# Altium PCB MD045B_PCB.PcbDoc (part 1 of 3)
Units mm, origin at the board's own origin, x right, y up, seen from the top; angles counter-clockwise.
Board outline 82.8 x 63.09 mm, 4 copper layers (Top Layer, Ground, Power, Bottom Layer), stack 1.707 mm thick; 146 components, 68 nets, 333 pads, 309 vias.
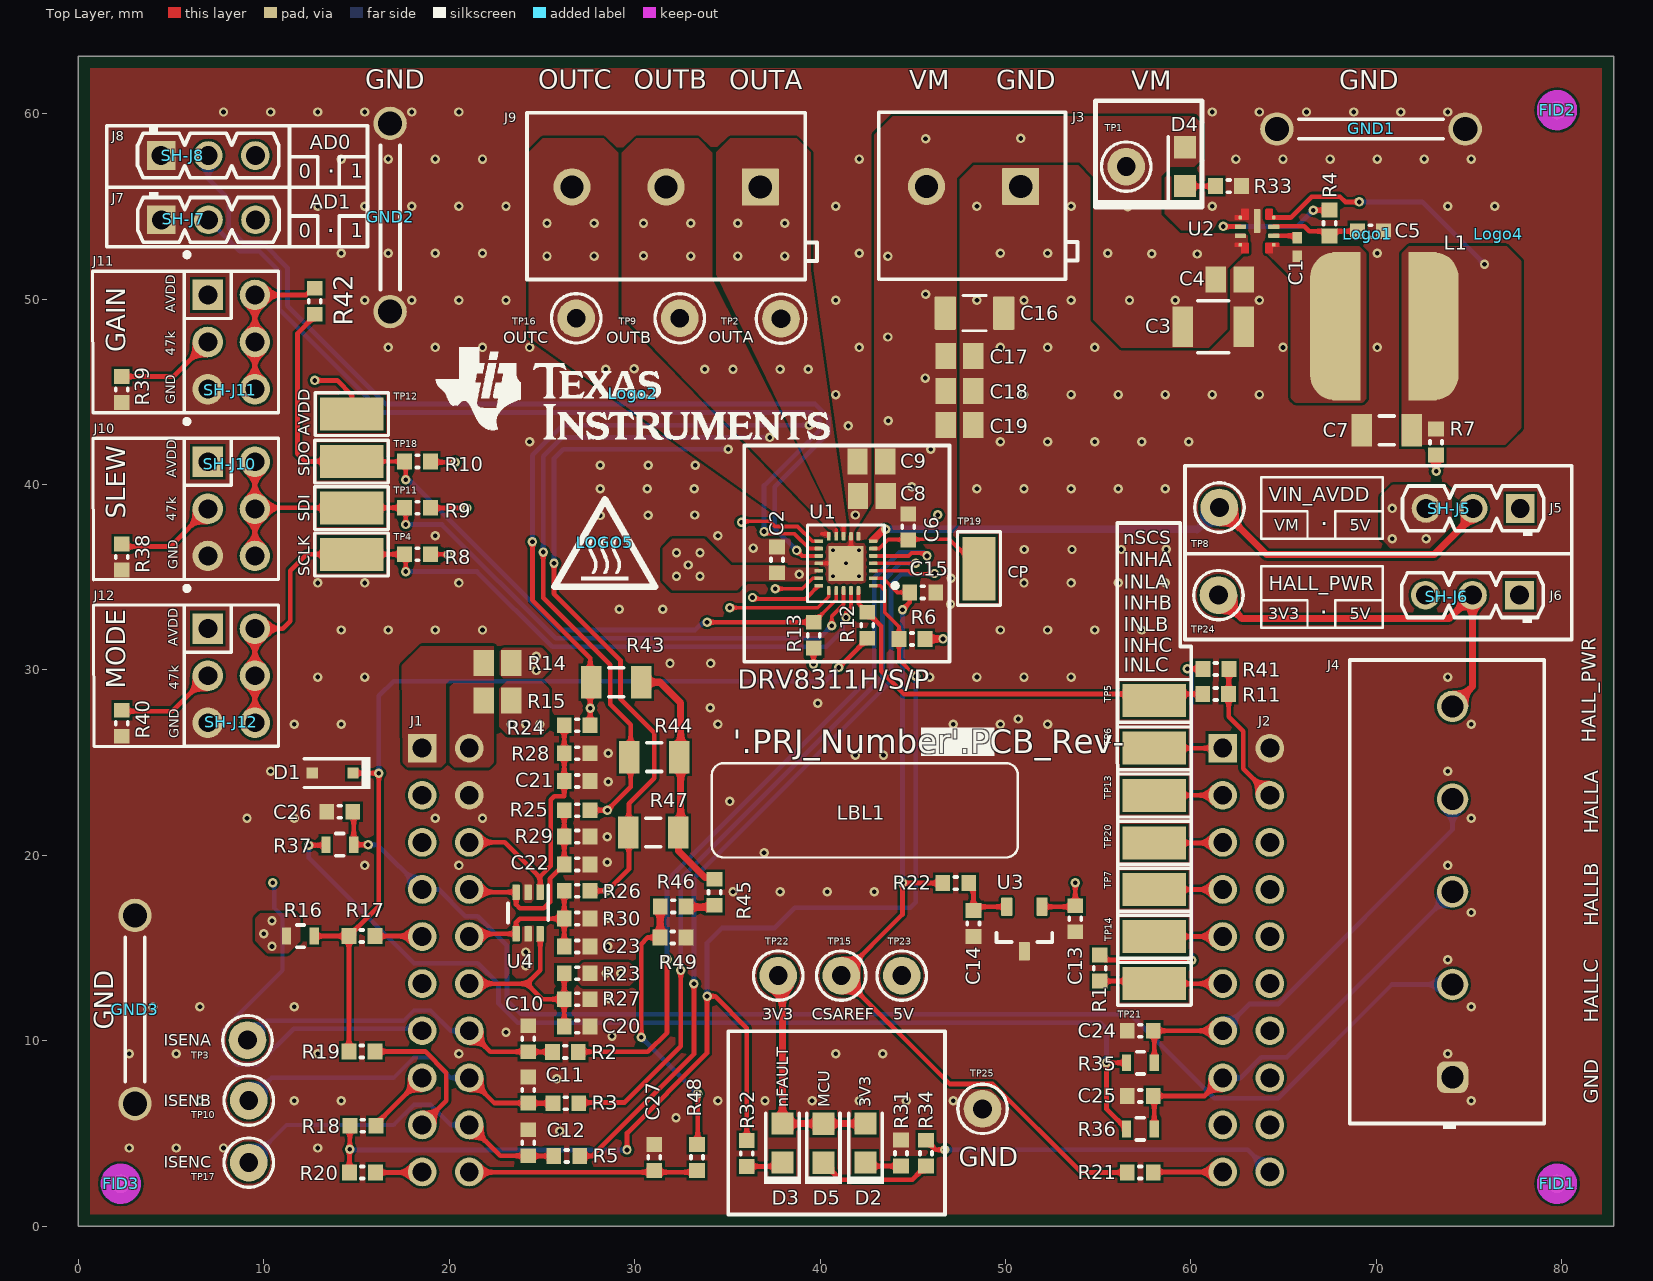
[diagram p0: Top Layer view]
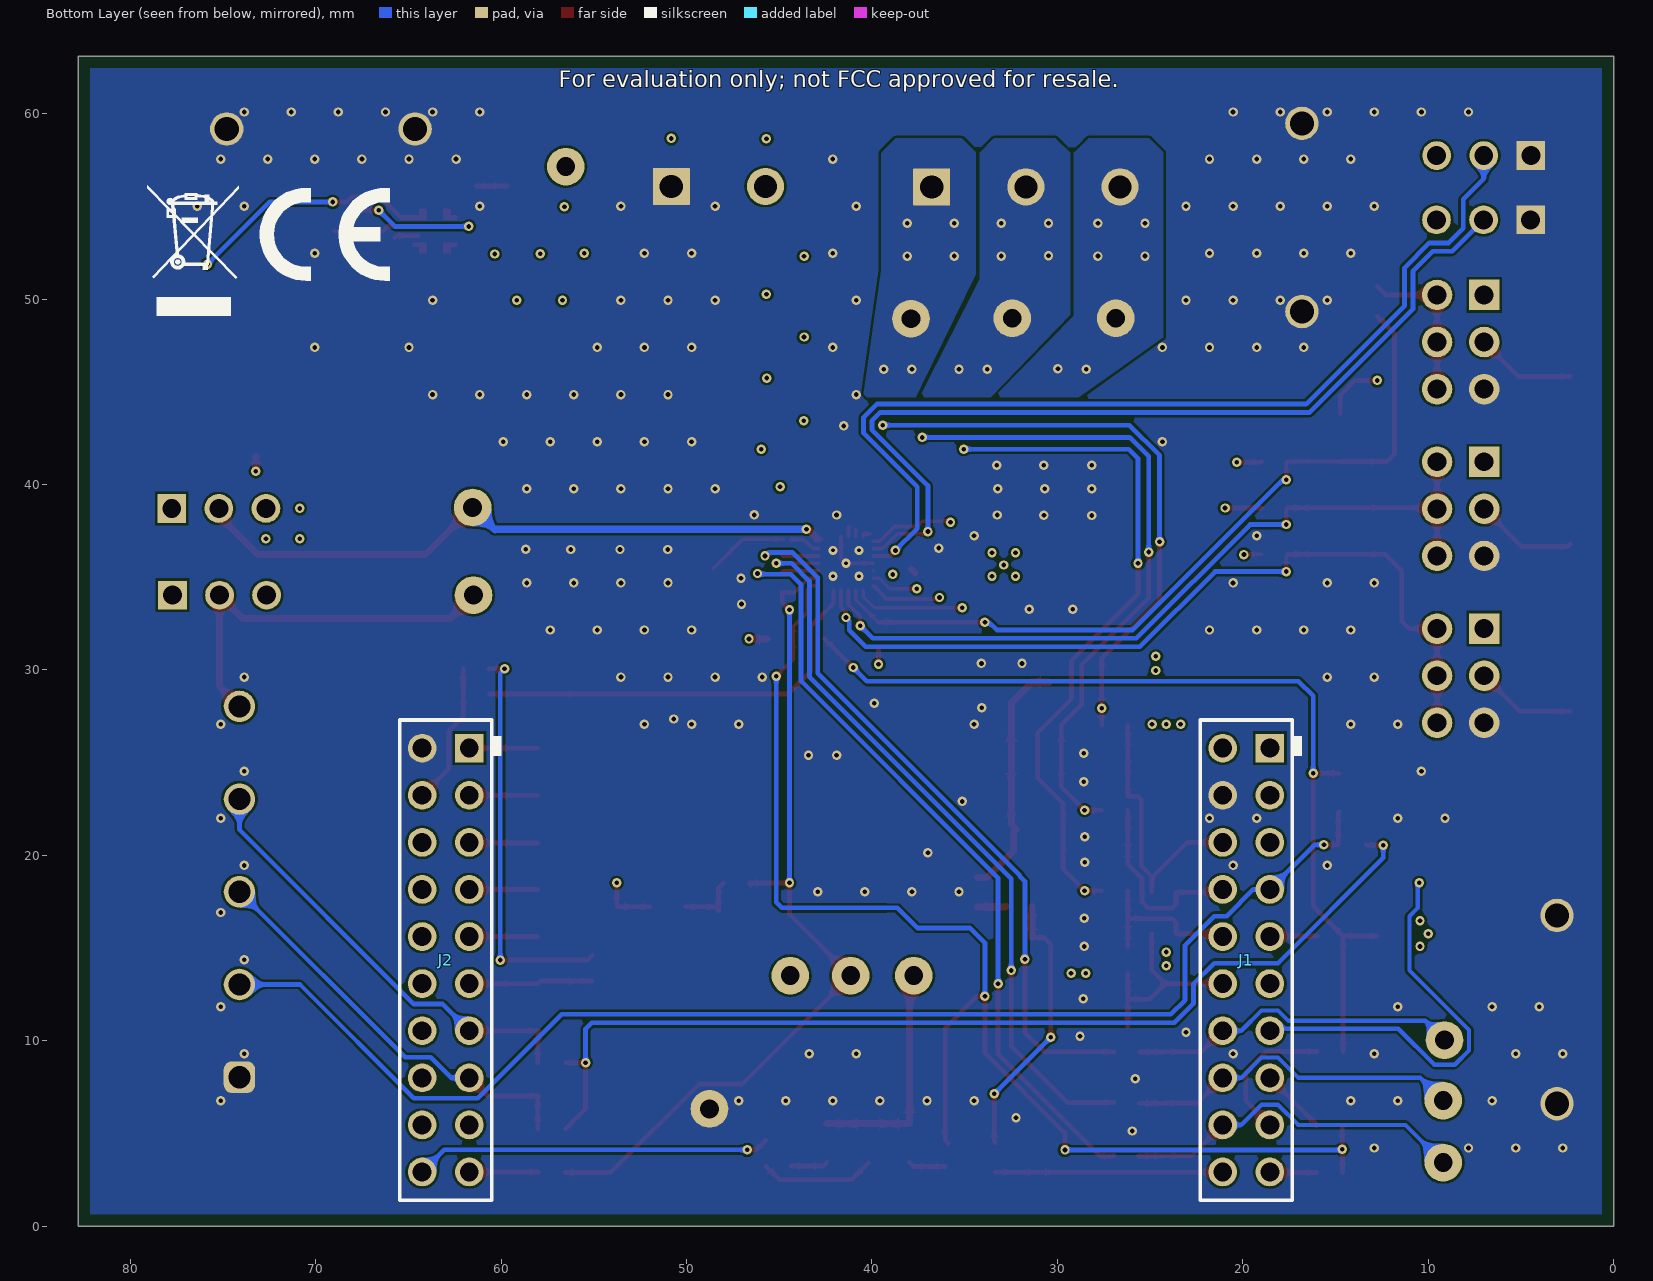
[diagram p1: Bottom Layer view, seen from below]
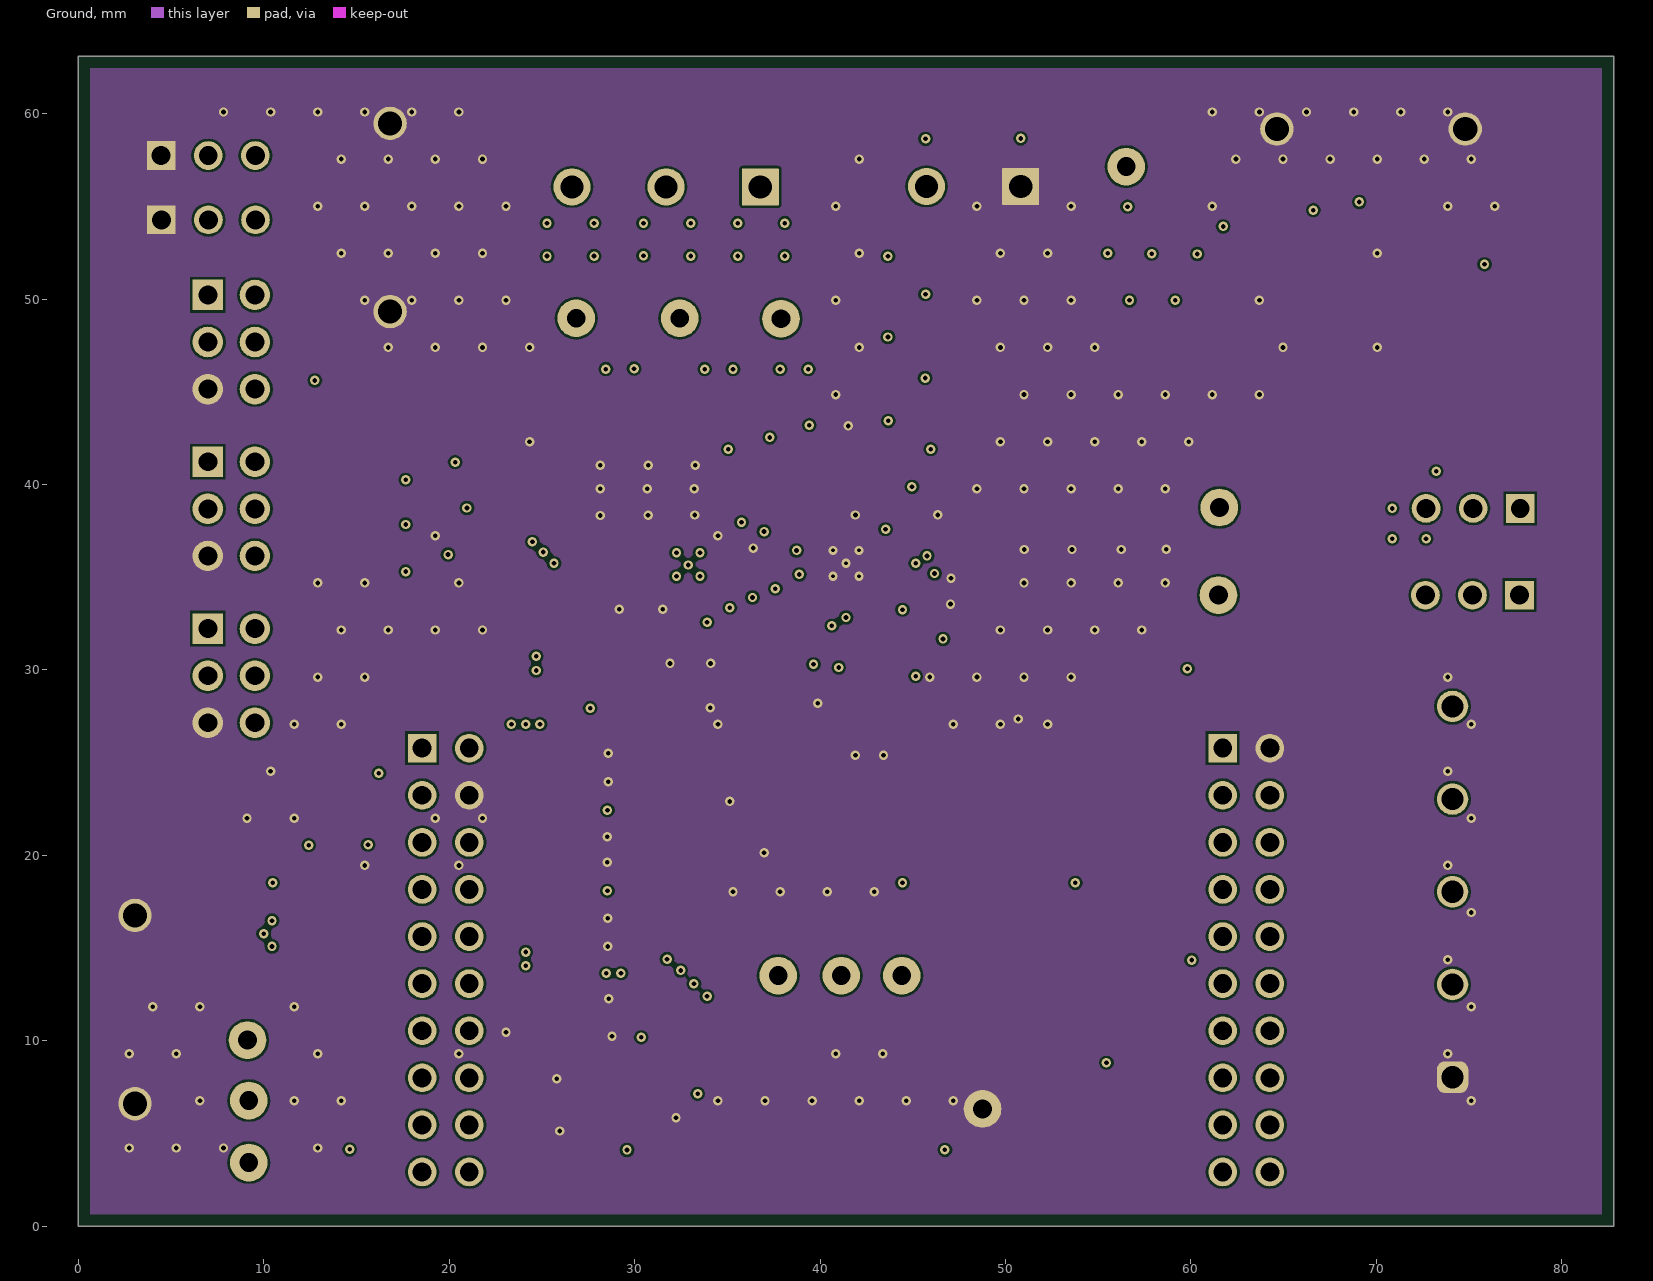
[diagram p2: Ground]
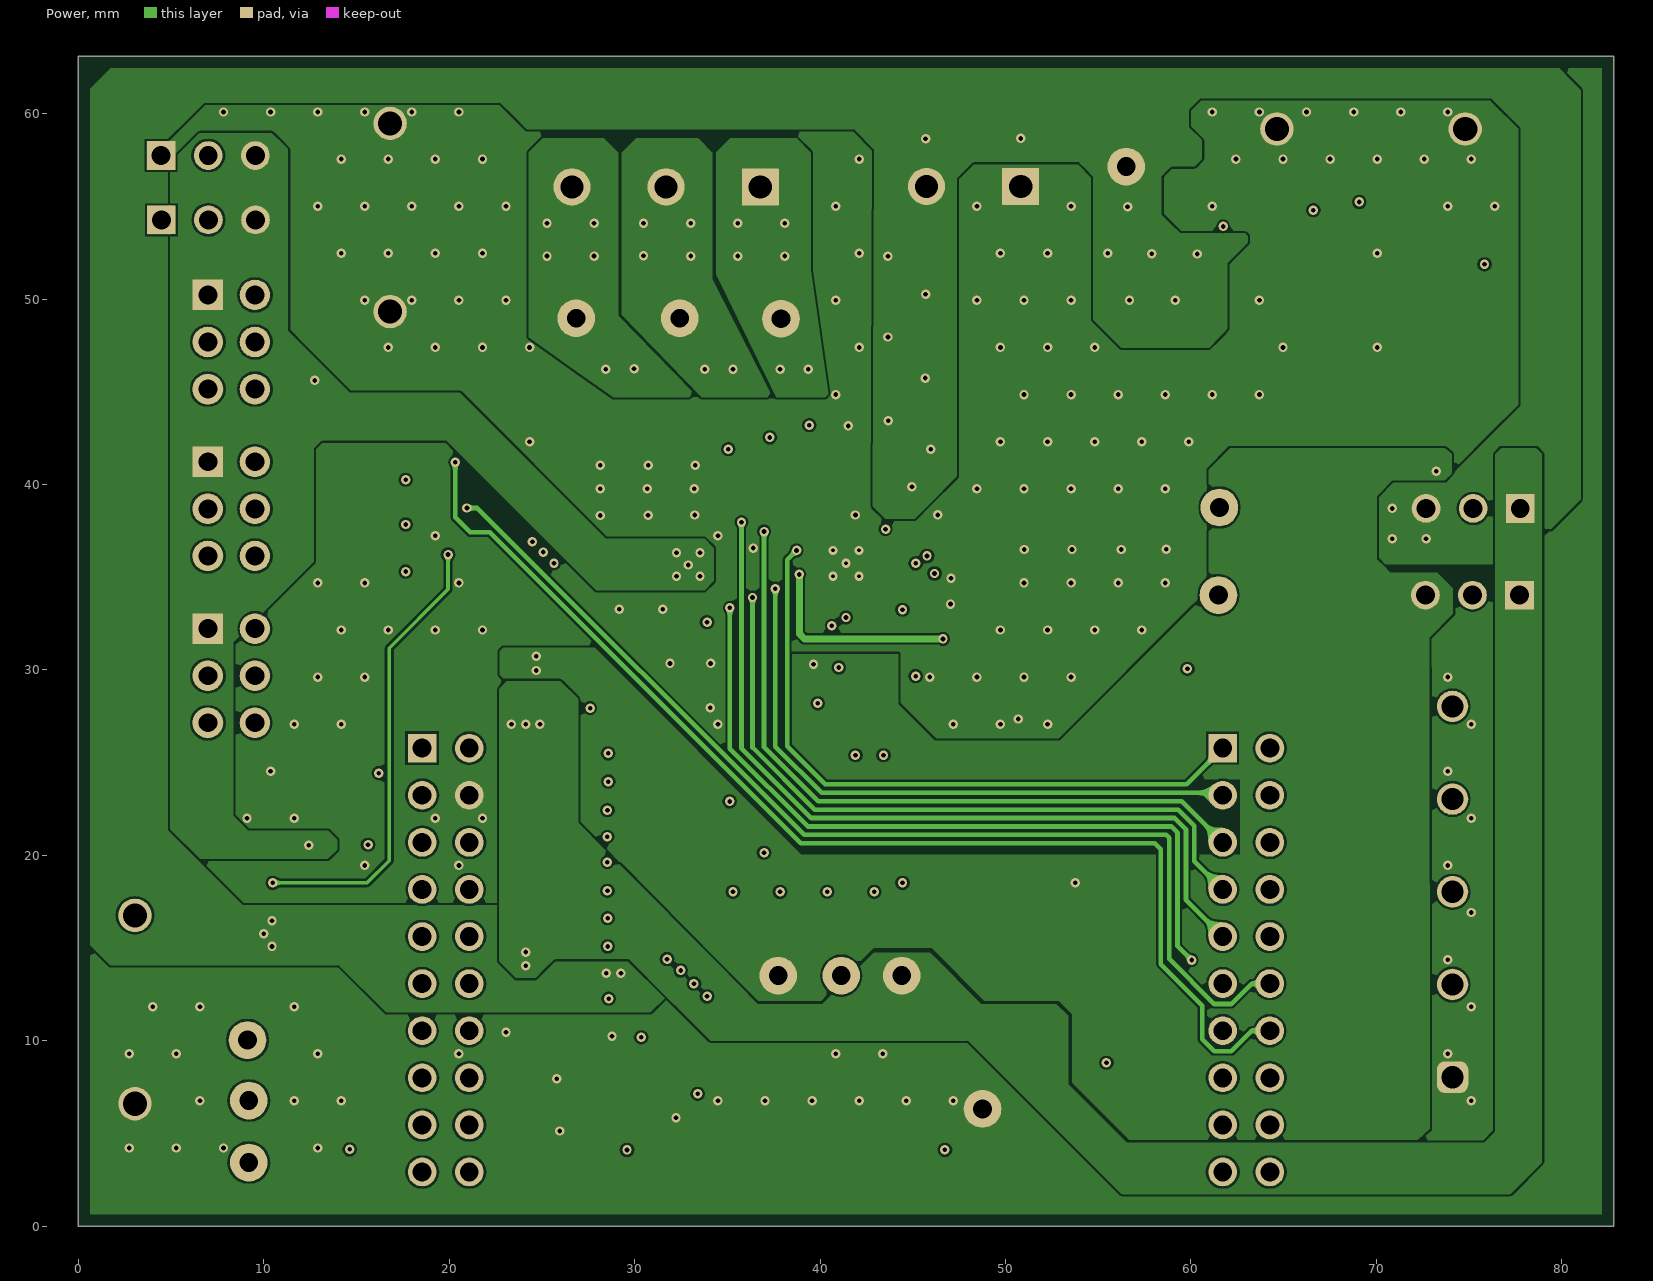
[diagram p3: Power]

## Layer stack, top to bottom
Top Solder: solder mask 0.0102, Solder Resist, Dk 3.5
Top Layer: signal copper 0.1067
Dielectric1: prepreg 0.2032, FR-4, Dk 4.2
Ground: signal copper 0.0356
Dielectric 2: core 1.016, FR-4, Dk 4.2
Power: signal copper 0.0356
Dielectric 3: prepreg 0.2032, FR-4, Dk 4.2
Bottom Layer: signal copper 0.1067
Bottom Solder: solder mask 0.0102, Solder Resist, Dk 3.5

## Board outline
0,0 82.804,0 82.804,63.094 0,63.094

## Design rules (kind name [scope] priority, off if disabled: settings)
AcuteAngle [All] p1: minimum=4.50000000000000E+0001 checktracksonly=FALSE
AssemblyTestPointUsage [All] p1: valid=2
BoardOutlineClearance BoardOutlineClearance_MountingHoles [OnCopper and InComponentClass('Mounting Holes')] p1: gap=1 ignorepadtopadclearanceinfootprint=FALSE
BoardOutlineClearance BoardOutlineClearance_Poly [OnCopper and IsPoly] p2: gap=0.635 ignorepadtopadclearanceinfootprint=FALSE
BoardOutlineClearance [OnCopper and Not InComponentClass('Logo') and not InComponentClass('FiducialMark') and not InRegion(1000,500,4000,800) and not InPoly] p3: gap=1.905 ignorepadtopadclearanceinfootprint=FALSE
Clearance Clearance_Keepouts [((IsTrack Or IsArc) And Not InPoly) And IsFree and IsKeepOut vs ((IsTrack Or IsArc) And Not InPoly) And IsFree and IsKeepOut] p1: gap=0 ignorepadtopadclearanceinfootprint=FALSE
Clearance Clearance_Poly [InPolygon] p2: gap=0.127 ignorepadtopadclearanceinfootprint=TRUE
Clearance Clearance_FiducialMark [IsKeepOut and InComponentClass('FiducialMark') vs IsPad and InComponentClass('FiducialMark')] p3: gap=0 ignorepadtopadclearanceinfootprint=FALSE
Clearance [All] p4: gap=0.2 ignorepadtopadclearanceinfootprint=TRUE
ComponentClearance ComponentClearance_MountingHoles_FiducialMarks [InComponentClass('Mounting Holes') vs InComponentClass('FiducialMark')] p1: gap=1.27 collisioncheckmode=3 verticalgap=0.254 showdistances=FALSE
ComponentClearance ComponentClearance_Shunt [InComponentClass('Header') vs InComponentClass('Shunt')] p2: gap=0 collisioncheckmode=3 verticalgap=0 showdistances=FALSE
ComponentClearance ComponentClearance_Logo [InComponentClass('Logo')] p3: gap=1.27 collisioncheckmode=3 verticalgap=0.254 showdistances=FALSE
ComponentClearance ComponentClearance_ScrewToNut [(HasFootprint('NY PMS 440 0025 PH')) vs (HasFootprint('Keystone_1902C'))] p4: gap=0.127 collisioncheckmode=3 verticalgap=0.254 showdistances=FALSE
ComponentClearance ComponentClearance_MountingHoles [InComponentClass('Mounting Holes')] p5: gap=6.35 collisioncheckmode=3 verticalgap=2540 showdistances=FALSE
ComponentClearance ComponentClearance_SmallPassives [HasFootprint('0201*') or HasFootprint('0402*') or HasFootprint('0508') or HasFootprint('0603*') or HasFootprint('0612') or HasFootprint('0805*') or HasFootprint('0815*') or HasFootprint('0830*') or HasFootprint('1206*') or HasFootprint('1210*') or HasFootprint('1808*') or HasFootprint('1812*') or HasFootprint('1825*') or HasFootprint('2010*') or HasFootprint('2220*') or HasFootprint('2225*') or HasFootprint('2512*') or HasFootprint('2728*') or HasFootprint('3518*') vs HasFootprint('0201*') or HasFootprint('0402*') or HasFootprint('0508') or HasFootprint('0603*') or HasFootprint('0612') or HasFootprint('0805*') or HasFootprint('0815*') or HasFootprint('0830*') or HasFootprint('1206*') or HasFootprint('1210*') or HasFootprint('1808*') or HasFootprint('1812*') or HasFootprint('1825*') or HasFootprint('2010*') or HasFootprint('2220*') or HasFootprint('2225*') or HasFootprint('2512*') or HasFootprint('2728*') or HasFootprint('3518*')] p6: gap=0.38 collisioncheckmode=3 verticalgap=0.254 showdistances=FALSE
ComponentClearance ComponentClearance_THtoSMT [IsThruComponent vs IsSMTComponent] p7: gap=1.016 collisioncheckmode=3 verticalgap=0.762 showdistances=FALSE
ComponentClearance ComponentClearance_THtoTH [IsThruComponent vs IsThruComponent] p8: gap=0.762 collisioncheckmode=3 verticalgap=0.762 showdistances=FALSE
ComponentClearance [All] p9: gap=0.762 collisioncheckmode=3 verticalgap=0.254 showdistances=FALSE
DiffPairsRouting [All] p1: maxlimit=2.54 minlimit=0.254 mostfreqgap=0.254 toplayer_minwidth=0.381 toplayer_maxwidth=0.381 toplayer_prefwidth=0.381 midlayer1_minwidth=0.381 midlayer1_maxwidth=0.381 midlayer1_prefwidth=0.381 midlayer2_minwidth=0.381 midlayer2_maxwidth=0.381 midlayer2_prefwidth=0.381 bottomlayer_minwidth=0.381 bottomlayer_maxwidth=0.381 bottomlayer_prefwidth=0.381 maxuncoupledlength=25.4
FabricationTestPointUsage TestPointUsage [All] p1: valid=2 allowmultiple=FALSE
FabricationTestpoint Testpoint [All] p1: side=3 testpointundercomponent=TRUE minsize=1.016 maxsize=2.54 preferedsize=1.524 minholesize=0 maxholesize=1.016 preferedholesize=0.813 testpointgrid=0.025 allowsidetop=TRUE allowsidebottom=TRUE usegrid=TRUE gridtolerance=0
FanoutControl Fanout_LCC [IsLCC] p1: bgadir=Out bgaviamode=Centered fanoutstyle=Auto fanoutdirection=Alternating viagrid=0.025 // Fanout_LCC (Default Rule)
FanoutControl Fanout_BGA [IsBGA] p2: bgadir=Out bgaviamode=Centered fanoutstyle=Auto fanoutdirection=Alternating viagrid=0.025 // Fanout_BGA (Default Rule)
FanoutControl Fanout_Default [All] p4: bgadir=Out bgaviamode=Centered fanoutstyle=Auto fanoutdirection=Alternating viagrid=0.025 // Fanout_Default (Default Rule)
FanoutControl Fanout_Small [(CompPinCount < 5)] p5: bgadir=Out bgaviamode=Centered fanoutstyle=Auto fanoutdirection=OutThenIn viagrid=0.025 // Fanout_Small (Default Rule)
HoleSize [All] p1: absolutevalues=TRUE maxlimit=6.375 minlimit=0.2 maxpercent=80.000 minpercent=20.000
MinimumAnnularRing MinimumAnnularRing_ThermalPadVias [IsVia and InAnyComponent] p1: minimumring=0.15
MinimumAnnularRing [All] p2: minimumring=0.127
MinimumSolderMaskSliver MinimumSolderMaskSliver_Logo [InComponentClass('Logo') vs InComponentClass('Logo')] p1: minsoldermaskwidth=0.018
MinimumSolderMaskSliver [All] p2: minsoldermaskwidth=0.1
PlaneConnect [All] p1: planeconnectstyle=Relief reliefexpansion=0.254 reliefentries=4 reliefconductorwidth=0.254 reliefairgap=0.254
PolygonConnect "All Pours Direct Connect" [All] p1: connectstyle=Direct reliefconductorwidth=0.254 reliefentries=4 polygonreliefangle="90 Angle" airgapwidth=0.254
RoutingVias ThermalPadVias [IsVia and InAnyComponent] p1: holewidth=0.2 width=0.5 viastyle="Through Hole" minholewidth=0.2 minwidth=0.5 maxholewidth=0.33 maxwidth=0.6
RoutingVias [All] p2 off: holewidth=0.406 width=0.864 viastyle="Through Hole" minholewidth=0.2 minwidth=0.66 maxholewidth=1.016 maxwidth=1.651
SilkToBoardRegionClearance [Not ((IsComment or IsDesignator) And (Hide <> 'False')) and not InRegion(1000,500,4000,800)] p1:
SilkToSilkClearance SilkToSilkClearance_Pb-FreeLogo [(HasFootprint('Pb-Free_Overlay_Medium') OR HasFootprint('Pb-Free_Overlay_Small')) vs (HasFootprint('Pb-Free_Overlay_Medium') OR HasFootprint('Pb-Free_Overlay_Small'))] p1: silktosilkclearance=0
SilkToSilkClearance [All] p2: silktosilkclearance=0.1
SilkToSolderMaskClearance SilkToComponentPadClearance [(IsPad or IsFill or IsRegion) and InAnycomponent] p1: minsilkscreentomaskgap=0.025 clearancetoexposedcopper=TRUE
SilkToSolderMaskClearance "Silk to Solder Mask Opening" [All] p2: minsilkscreentomaskgap=0.1 clearancetoexposedcopper=FALSE
SolderMaskExpansion [All] p1: expansion=0.05
UnRoutedNet [All] p1: checkbadconnections=TRUE
Width [All] p1: maxlimit=0.381 minlimit=0.2 preferedwidth=0.254 bottomlayer_minwidth=0.225 minimp=50.000000 maximp=50.000000 favimp=50.000000 checkconnectedcopper=TRUE
14 further rules are at their usual default settings.

## Classes and differential pairs
component class Shunt: SH-J5 SH-J6 SH-J7 SH-J8 SH-J10 SH-J11 SH-J12
component class MD045B_POWER_AND_CONNECTORS: C16 C17 C18 C19 C20 C21 C22 C23 C24 C25 C26 C27 D2 D3 D4 D5 GND1 GND2 GND3 J3 J4 J5 J6 J7 J8 J9 J10 J11 J12 R23 R24 R25 R26 R27 R28 R29 R30 R31 R32 R33 R34 R35 R36 R37 R38 R39 R40 R42 R43 R44 R45 R46 R47 R48 R49 SH-J5 SH-J6 SH-J7 SH-J8 SH-J10 SH-J11 SH-J12 TP24 TP25 U4
component class MD045B_DRIVER: C1 C2 C3 C4 C5 C6 C7 C8 C9 C10 C11 C12 C13 C14 C15 D1 J1 J2 L1 R1 R2 R3 R4 R5 R6 R7 R8 R9 R10 R11 R12 R13 R14 R15 R16 R17 R18 R19 R20 R21 R22 R41 TP1 TP2 TP3 TP4 TP5 TP6 TP7 TP8 TP9 TP10 TP11 TP12 TP13 TP14 TP15 TP16 TP17 TP18 TP19 TP20 TP21 TP22 TP23 U1 U2 U3
component class Header: J5 J6 J7 J8 J10 J11 J12
component class Logo: Logo2
component class MD045B_HARDWARE: FID1 FID2 FID3 LBL1 Logo1 Logo2 Logo3 Logo4 LOGO5 ZZ1 ZZ2 ZZ3 ZZ4
component class FiducialMark: FID1 FID2 FID3
component class AssemblyNote: ZZ1 ZZ2 ZZ3 ZZ4
component class Label: LBL1

## Components (designator, comment, footprint, x,y, rotation, side; value= is the part's Value field where it differs from the comment)
C1 "CL05B104KP5NNNC" 0402L 65.735,52.815 r270 top value=0.1uF
C2 "GRM188R61E475KE11D" 0603L 37.681,35.94 r90 top value=4.7uF
C3 "C3225X7R1H225K250AB" 1210_280 61.214,48.514 r0 top value=2.2uF
C4 "C0805C104K5RACAUTO" 0805L 62.103,51.054 r0 top value=0.1uF
C5 "EMK107B7105KA-T" 0603L 69.698,53.67 r0 top value=1uF
C6 "CL10B104KO8NNNC" 0603L 44.755,37.719 r90 top value=0.1uF
C7 "GRM31CR71A226KE15L" 1206_180L 70.561,42.926 r180 top value=22uF
C8 "GRM21BC71E106KE11L" 0805L 42.799,39.395 r180 top value=10uF
C9 "C0805C104K5RACAUTO" 0805L 42.774,41.25 r180 top value=0.1uF
C10 "CGA3E2C0G1H220J080AA" 0603L 24.257,10.109 r90 top value=22pF
C11 "CGA3E2C0G1H220J080AA" 0603L 24.257,7.341 r90 top value=22pF
C12 "CGA3E2C0G1H220J080AA" 0603L 24.257,4.496 r90 top value=22pF
C13 "C0603C104K9RAC7867" 0603L 53.774,16.578 r270 top value=0.1uF
C14 "CL10B105KQ8NNNC" 0603L 48.274,16.328 r270 top value=1uF
C15 "C0603C104K9RAC7867" 0603L 45.542,34.184 r0 top value=0.1uF
C16 "GRM31CR61E476ME44L" FP-GRM31CR61E476ME44L_1206-MFG 48.336,49.251 r180 top value=47µF
C17 "C0805C104K5RACAUTO" 0805L 47.523,46.939 r0 top value=0.1uF
C18 "885012207103" 0805L 47.523,45.06 r0 top value=1uF
C19 "GRM21BC71E106KE11L" 0805L 47.523,43.205 r0 top value=10uF
C20 "06035C104JAT2A" 0603L 26.902,10.763 r0 top value=0.1uF
C21 "06035C104JAT2A" 0603L 26.902,24.013 r180 top value=0.1uF
C22 "06035C104JAT2A" 0603L 26.902,19.513 r0 top value=0.1uF
C23 "06035C104JAT2A" 0603L 26.902,15.088 r0 top value=0.1uF
C24 "885012206034" 0603L 57.277,10.541 r180 top value=1000pF
C25 "885012206034" 0603L 57.277,7.021 r180 top value=1000pF
C26 "885012206034" 0603L 14.097,22.352 r180 top value=1000pF
C27 "0603ZC100KAT2A" 0603L 31.064,3.708 r90 top value=10pF
D1 "SZMM3Z3V3ST1G" SOD-323 13.708,24.435 r180 top value=3.3V
D2 "LTST-C170KGKT" LTST-C170KGKT_Green 42.451,4.48 r270 top value=Green
D3 "LTST-C170KRKT" LED_LTST-C170_Red 37.973,4.481 r270 top value=Red
D4 "LTST-C170KGKT" LTST-C170KGKT_Green 59.69,57.15 r270 top value=Green
D5 "LTST-C170KFKT" LTST-C170KFKT_Orange 40.183,4.474 r270 top value=Orange
FID1 "Fiducial" Fiducial10-20 79.756,2.286 r0 top
FID2 "Fiducial" Fiducial10-20 79.756,60.198 r0 top
FID3 "Fiducial" Fiducial10-20 2.286,2.286 r0 top
GND1 "GND" Harwin_D3082-05 69.723,59.182 r180 top
GND2 "GND" Harwin_D3082-05 16.815,54.407 r90 top
GND3 "GND" Harwin_D3082-05 3.048,11.684 r90 top
J1 "SSQ-110-03-G-D" Samtec_SSQ-110-03-x-D 19.812,14.351 r270 bottom
J2 "SSQ-110-03-G-D" Samtec_SSQ-110-03-x-D 62.992,14.351 r270 bottom
J3 "VM_IN" On-Shore_ED120_2DS 48.285,56.083 r180 top
J4 "HALL IN" Phoenix_1792892 74.117,18.034 r90 top
J5 "VIN_AVDD_SEL" FCI_68001-403HLF 75.23,38.713 r180 top
J6 "HALL_PWR_SEL" FCI_68001-403HLF 75.195,34.036 r180 top
J7 "AD1" FCI_68001-403HLF 7.01,54.28 r0 top
J8 "ADO" FCI_68001-403HLF 7,57.75 r0 top
J9 "MOTOR_OUT" On-Shore_ED120_3DS 31.699,56.058 r180 top
J10 "Header_3x2" TSW-103-07-G-D 8.25,38.69 r270 top
J11 "Header_3x2" TSW-103-07-G-D 8.25,47.69 r270 top
J12 "Header_3x2" TSW-103-07-G-D 8.25,29.69 r270 top
L1 "SDR0805-120ML" SDR0805 70.442,48.541 r0 top value=12uH
LBL1 "THT-14-423-10" Label_650x200 42.418,22.428 r0 top
Logo1 "CE Mark" CE_Mark_5mm 69.52,53.492 r180 top
Logo2 "Texas Instruments" TI_Stacked_Overlay_Small 29.896,44.907 r0 top
Logo3 "FCC disclaimer" FCC_disclaimer 59.69,85.852 r0 top
Logo4 "WEEE logo" WEEE_Minimum 76.581,53.492 r0 top
LOGO5 "CAUTION HOT SURFACE" IEC_HotSurface_Small 28.397,36.85 r0 top
R1 "ERJ-3GEY0R00V" 0603L 55.093,13.919 r90 top value=0
R2 "RC0603FR-07330RL" 0603L 26.264,9.398 r0 top value=330
R3 "RC0603FR-07330RL" 0603L 26.289,6.629 r0 top value=330
R4 "CRCW0603100KFKEA" 0603L 67.488,54.102 r90 top value=100k
R5 "RC0603FR-07330RL" 0603L 26.34,3.785 r0 top value=330
R6 "CRCW06035K10JNEA" 0603L 44.958,31.674 r180 top value=5.1k
R7 "ERJ-3GEY0R00V" 0603L 73.228,42.291 r270 top value=0
R8 "ERJ-3GEY0R00V" 0603L 18.288,36.241 r180 top value=0
R9 "ERJ-3GEY0R00V" 0603L 18.288,38.748 r180 top value=0
R10 "ERJ-3GEY0R00V" 0603L 18.288,41.25 r180 top value=0
R11 "ERJ-3GEY0R00V" 0603L 61.341,28.702 r180 top value=0
R12 "ERJ-3GEY0R00V" 0603L 42.545,32.41 r90 top value=0
R13 "CRCW06035K10JNEA" 0603L 39.665,31.877 r90 top value=5.1k
R14 "ERJ-6GEY0R00V" 0805L 22.606,30.378 r180 top value=0
R15 "ERJ-6GEY0R00V" 0805L 22.606,28.346 r0 top value=0
R16 "TNPW060310K0BEEA" TNPW0603 11.971,15.646 r180 top value=10.0k
R17 "ERJ-3GEY0R00V" 0603L 15.291,15.646 r0 top value=0
R18 "ERJ-3GEY0R00V" 0603L 15.342,5.41 r0 top value=0
R19 "ERJ-3GEY0R00V" 0603L 15.291,9.423 r0 top value=0
R20 "ERJ-3GEY0R00V" 0603L 15.316,2.896 r0 top value=0
R21 "ERJ-3GEY0R00V" 0603L 57.277,2.896 r0 top value=0
R22 "ERJ-3GEY0R00V" 0603L 47.324,18.504 r0 top value=0
R23 "CRCW060375K0FKEA" 0603L 26.902,13.642 r0 top value=75.0k
R24 "CRCW060375K0FKEA" 0603L 26.902,27.013 r0 top value=75.0k
R25 "CRCW060375K0FKEA" 0603L 26.902,22.438 r0 top value=75.0k
R26 "CRCW060375K0FKEA" 0603L 26.902,18.088 r0 top value=75.0k
R27 "CRCW060310K5FKEA" 0603L 26.902,12.242 r180 top value=10.5k
R28 "CRCW060310K5FKEA" 0603L 26.902,25.513 r180 top value=10.5k
R29 "CRCW060310K5FKEA" 0603L 26.902,21.013 r180 top value=10.5k
R30 "CRCW060310K5FKEA" 0603L 26.902,16.588 r180 top value=10.5k
R31 "RC0603FR-07330RL" 0603L 44.37,3.939 r270 top value=330
R32 "RC0603FR-07330RL" 0603L 36.05,3.922 r270 top value=330
R33 "RG1608P-202-B-T5" 0603L 62.041,56.1 r180 top value=2.00k
R34 "RC0603FR-07330RL" 0603L 45.72,3.937 r270 top value=330
R35 "TNPW060310K0BEEA" TNPW0603 57.286,8.805 r180 top value=10.0k
R36 "TNPW060310K0BEEA" TNPW0603 57.277,5.243 r180 top value=10.0k
R37 "TNPW060310K0BEEA" TNPW0603 14.097,20.574 r180 top value=10.0k
R38 "MCT0603MD4702DP500" 0603L 2.337,36.093 r90 top value=47.0k
R39 "MCT0603MD4702DP500" 0603L 2.337,45.129 r90 top value=47.0k
R40 "MCT0603MD4702DP500" 0603L 2.337,27.127 r90 top value=47.0k
R41 "ERJ-3GEY0R00V" 0603L 61.353,30.048 r180 top value=0
R42 "RT0603BRD07100RL" 0603L 12.751,49.886 r90 top value=100
R43 "RP73D2B1K0BTG" 1206L 29.005,29.337 r0 top value=1.00k
R44 "RP73D2B1K0BTG" 1206L 31.064,25.298 r0 top value=1.00k
R45 "ERJ-3GEY0R00V" 0603L 34.315,18.009 r270 top value=0
R46 "CRCW060375K0FKEA" 0603L 32.08,17.247 r0 top value=75.0k
R47 "RP73D2B1K0BTG" 1206L 31.013,21.234 r0 top value=1.00k
R48 "ERJ-3GEY0R00V" 0603L 33.363,3.708 r270 top value=0
R49 "CRCW060310K5FKEA" 0603L 32.066,15.57 r180 top value=10.5k
SH-J5 "SNT-100-BK-G" SNT-100-BK-G 73.939,38.71 r180 top value=1x2
SH-J6 "SNT-100-BK-G" SNT-100-BK-G 73.808,33.96 r180 top value=1x2
SH-J7 "SNT-100-BK-G" SNT-100-BK-G 5.69,54.305 r180 top value=1x2
SH-J8 "SNT-100-BK-G" SNT-100-BK-G 5.639,57.734 r180 top value=1x2
SH-J10 "SNT-100-BK-G" SNT-100-BK-G 8.153,41.097 r180 top value=1x2
SH-J11 "SNT-100-BK-G" SNT-100-BK-G 8.179,45.085 r180 top value=1x2
SH-J12 "SNT-100-BK-G" SNT-100-BK-G 8.23,27.178 r180 top value=1x2
TP1 "VM" Keystone5000 56.515,57.15 r90 top
TP2 "OUTA" Keystone5000 37.897,48.946 r90 top
TP3 "ISENA" Keystone5000 9.119,10.033 r90 top
TP4 "SCLK" Testpoint_Keystone_Miniature 14.732,36.241 r0 top
TP5 "nSCS" Testpoint_Keystone_Miniature 58.039,28.346 r0 top
TP6 "INHA" Testpoint_Keystone_Miniature 58.025,25.781 r0 top
TP7 "INLB" Testpoint_Keystone_Miniature 58.025,18.161 r0 top
TP8 "VIN_AVDD" Keystone5000 61.543,38.764 r90 top
TP9 "OUTB" Keystone5000 32.436,48.971 r90 top
TP10 "ISENB" Keystone5000 9.19,6.773 r90 top
TP11 "SDI" Testpoint_Keystone_Miniature 14.732,38.748 r0 top
TP12 "AVDD" Testpoint_Keystone_Miniature 14.747,43.815 r0 top
TP13 "INLA" Testpoint_Keystone_Miniature 58.025,23.241 r0 top
TP14 "INHC" Testpoint_Keystone_Miniature 58.025,15.621 r0 top
TP15 "CSAREF" Keystone5000 41.148,13.513 r90 top
TP16 "OUTC" Keystone5000 26.848,48.971 r90 top
TP17 "ISENC" Keystone5000 9.19,3.429 r90 top
TP18 "SDO" Testpoint_Keystone_Miniature 14.732,41.25 r0 top
TP19 "CP" Testpoint_Keystone_Miniature 48.565,35.469 r90 top
TP20 "INHB" Testpoint_Keystone_Miniature 58.025,20.67 r180 top
TP21 "INLC" Testpoint_Keystone_Miniature 58.025,13.081 r0 top
TP22 "3V3" Keystone5000 37.744,13.513 r90 top
TP23 "5V" Keystone5000 44.408,13.513 r90 top
TP24 "HALL_PWR" Keystone5000 61.491,34.036 r90 top
TP25 "GND" Keystone5001 48.768,6.325 r90 top
U1 "DRV8311HRRWR" RRW0024-MFG 41.402,35.75 r180 top
U2 "LMR36506MSC3RPETQ1" RPE0009A 63.575,53.667 r0 top
U3 "REF3130AQDBZRQ1" DBZ0003A_N 51.024,16.028 r270 top
U4 "TPD4S009DCKR" DCK0006A_N 24.257,16.891 r270 top
ZZ1 "This Assembly Note is for PCB labels only" AssemblyNoteLabel 4.699,100.025 r0 top
ZZ2 "These assemblies are ESD sensitive, ESD precautions shall be observed." AssemblyNote 4.699,97.259 r0 top
ZZ3 "These assemblies must be clean and free from flux and all contaminants. Use of no clean flux is not acceptable." AssemblyNote 4.699,95.01 r0 top
ZZ4 "These assemblies must comply with workmanship standards IPC-A-610 Class 2, unless otherwise specified." AssemblyNote 4.699,92.761 r0 top

## Footprints (in the part's own frame and the unit in brackets; to place one, negate y for a bottom-side part, rotate by r counter-clockwise, add the part's x,y. Pads: shape width x height; smd on the part's side, far side on the other; paste and mask are expansions set on the pad)
0402L [mm] "0402 from SM-752 data"
  rect 0.6x0.5 smd: 1(-0.5,0) 2(0.5,0)
  body extent -0.55,-0.3 0.55,0.3, height 0.6
0603L [mm] "0603 from SM-752 data"
  rect 0.8x0.85 smd: 1(-0.7,0) 2(0.7,0)
  silkscreen extent -0.07,-0.33 0.07,0.33, body extent -0.87,-0.47 0.87,0.47, height 1
0805L [mm] "0805 from SM-752 data"
  rect 1.1x1.4 smd: 1(-0.75,0) 2(0.75,0)
  body extent -1.1,-0.72 1.1,0.72, height 1.45
1206_180L [mm] "1206_180"
  rect 1.1x1.75 smd: 1(-1.35,0) 2(1.35,0)
  silkscreen extent -0.4,-0.77 0.4,0.77, body extent -1.75,-0.95 1.75,0.95, height 1.8
1206L [mm] "1206 from SM-752 data"
  rect 1.1x1.75 smd: 1(-1.35,0) 2(1.35,0)
  silkscreen extent -0.4,-0.77 0.4,0.77, body extent -1.7,-0.9 1.7,0.9, height 1.35
1210_280 [mm] "SMD, 2-Leads, Body 3.6x2.8mm, Height 2.8mm"
  rect 1.1x2.2 smd: 1(-1.65,0) 2(1.65,0)
  silkscreen extent -0.84,-1.4 0.84,1.4, body extent -1.8,-1.4 1.8,1.4, height 2.8
AssemblyNote [mm] "Assembly Note"
AssemblyNoteLabel [mm] "Assembly Note for PCB Labels"
CE_Mark_5mm [mm] "Minimum text height for CE Mark"
DBZ0003A_N [mm] "SOT23, 3-Leads, Body 2.9x1.3mm, Pitch 0.95mm, Lead Span 2.4mm, IPC Medium Density"
  rrect17% 1x0.6 smd: 1(-1.2,0.95) 2(-1.2,-0.95) 3(1.2,0)
  silkscreen extent 0.2,-1.5 0.7,1.5, body extent -1.26,-1.46 1.26,1.46, height 0.98
DCK0006A_N [mm] "SOT23, 6-Leads, Body 2x1.3mm, Pitch 0.65mm, Lead Span 2.1mm, IPC Medium Density"
  rrect25% 0.85x0.4 smd: 1(-1.125,0.65) 2(-1.125,0) 3(-1.125,-0.65) 4(1.125,-0.65) 5(1.125,0) 6(1.125,0.65)
  silkscreen extent -1.5,-1.09 0.51,1.09, body extent -1.14,-1 1.14,1, height 0.95
FCC_disclaimer [mm]
FCI_68001-403HLF [mm] "Header, 2.54mm, 3x1, TH"
  rect 1.55x1.55 hole 1.02: 1(-2.54,0)
  round 1.55 hole 1.02: 2(0,0) 3(2.54,0)
  silkscreen extent -3.81,-1.21 3.81,1.5, body extent -3.81,-1.21 3.81,1.21, height 8.38
Fiducial10-20 [mm]
  round 1 smd mask+0.5: 1(0,0)
  Top Layer keep-out circle w1.178: c0,0 r0.5
FP-GRM31CR61E476ME44L_1206-MFG [mm]
  rrect9% 1.15x1.8 smd paste+0 mask+0: 1(-1.575,0) 2(1.575,0)
  silkscreen extent -0.63,-0.95 0.63,0.95, body extent -2.25,-1.05 2.25,1.05, height 0.25
Harwin_D3082-05 [mm] "Shorting Plug, 10.16mm spacing, TH"
  round 1.8 hole 1.3: 1(-5.08,0) 2(5.08,0)
  silkscreen extent -3.9,-0.53 3.9,0.53, body extent -5.6,-0.52 5.61,0.52, height 6.63
IEC_HotSurface_Small [mm]
  silkscreen extent -2.72,-2.36 2.72,2.35
Keystone5000 [mil] "For Keystone 500x miniature loop terminals"
  round 80 hole 40: 1(0,0)
  silkscreen extent -52,-52 52,52, body extent -49,-49 49,49, height 182
Keystone5001 [mil] "For Keystone 500x miniature loop terminals"
  round 80 hole 40: 1(0,0)
  silkscreen extent -52,-52 52,52, body extent -49,-49 49,49, height 182
Label_650x200 [mil] "Thermal Transfer Label"
  round 1 on Mech13: 0(0,0)
  silkscreen extent -325,-100 325,100, body extent -325,-100 325,100, height 1
LED_LTST-C170_Red [mm] "LITE-ON"
  rect 1.2x1.2 smd: 1(-1.05,0) 2(1.05,0)
  silkscreen extent -1.6,-1 2.2,1, body extent -1.05,-0.67 1.05,0.67, height 1.1
LTST-C170KFKT_Orange [mm] "LITE-ON"
  rect 1.2x1.2 smd: 1(-1.05,0) 2(1.05,0)
  silkscreen extent -1.6,-1 2.2,1, body extent -1.05,-0.67 1.05,0.67, height 1.1
LTST-C170KGKT_Green [mm] "LITE-ON"
  rect 1.2x1.2 smd: 1(-1.05,0) 2(1.05,0)
  silkscreen extent -1.6,-1 2.2,1, body extent -1.05,-0.67 1.05,0.67, height 1.1
On-Shore_ED120_2DS [mm] "ONSHORE"
  rrect5% 2x2 hole 1.25: 1(-2.54,0)
  round 2 hole 1.25: 2(2.54,0)
  silkscreen extent -5.6,-4 5.12,5, body extent -5.78,-4 5.08,5, height 13
On-Shore_ED120_3DS [mm] "ONSHORE"
  rrect5% 2x2 hole 1.25: 1(-5.08,0)
  round 2 hole 1.25: 2(0,0) 3(5.08,0)
  silkscreen extent -8.14,-4 7.5,5, body extent -8.32,-4 7.62,5, height 13
Phoenix_1792892 [mm] "Terminal Block, 5mm, 5x1, R/A, TH"
  rrect50% 1.7x1.7 hole 1.2: 1(-10,0)
  round 1.7 hole 1.2: 2(-5,0) 3(0,0) 4(5,0) 5(10,0)
  silkscreen extent -12.8,-4.95 12.5,5.55, body extent -12.5,-4.95 12.5,5.55, height 13.6
RPE0009A [mm] "VQFN, 9-Leads, Body 2x2.mm"
  rrect50% 0.2x0.2 smd paste+0: 1(-0.9,0.738) 4(-0.9,-0.738) 5(0.9,-0.738) 8(0.9,0.738)
  rrect40% 0.6x0.25 smd: 2(-0.9,0.25) 3(-0.9,-0.25) 6(0.9,-0.25) 7(0.9,0.25)
  rrect29% 0.35x1.3 smd paste-0.35: 9(0,0.55)
  Top Layer region: 1.2,-0.676 1.2,-0.801 1.196,-0.82 1.185,-0.836 1.169,-0.847 1.15,-0.851 1.15,-0.851 0.9,-0.851 0.881,-0.854 0.865,-0.865 0.854,-0.881 0.85,-0.901 0.85,-0.901 0.85,-1.151 0.846,-1.17 0.835,-1.186 0.819,-1.197 0.8,-1.201 0.8,-1.201 0.5,-1.201 0.481,-1.197 0.465,-1.186 0.454,-1.17 0.45,-1.151 0.45,-1.151 0.45,-0.676 0.454,-0.656 0.465,-0.64 0.481,-0.629 0.5,-0.626 0.5,-0.626 1.15,-0.626 1.169,-0.629 1.185,-0.64 1.196,-0.656 1.2,-0.676
  Top Layer region: -1.2,-0.676 -1.2,-0.801 -1.196,-0.82 -1.185,-0.836 -1.169,-0.847 -1.15,-0.851 -1.15,-0.851 -0.9,-0.851 -0.881,-0.854 -0.865,-0.865 -0.854,-0.881 -0.85,-0.901 -0.85,-0.901 -0.85,-1.151 -0.846,-1.17 -0.835,-1.186 -0.819,-1.197 -0.8,-1.201 -0.8,-1.201 -0.5,-1.201 -0.481,-1.197 -0.465,-1.186 -0.454,-1.17 -0.45,-1.151 -0.45,-1.151 -0.45,-0.676 -0.454,-0.656 -0.465,-0.64 -0.481,-0.629 -0.5,-0.626 -0.5,-0.626 -1.15,-0.626 -1.169,-0.629 -1.185,-0.64 -1.196,-0.656 -1.2,-0.676
  Top Layer region: 1.2,0.676 1.2,0.801 1.196,0.82 1.185,0.836 1.169,0.847 1.15,0.851 1.15,0.851 0.9,0.851 0.881,0.854 0.865,0.865 0.854,0.881 0.85,0.901 0.85,0.901 0.85,1.151 0.846,1.17 0.835,1.186 0.819,1.197 0.8,1.201 0.8,1.201 0.5,1.201 0.481,1.197 0.465,1.186 0.454,1.17 0.45,1.151 0.45,1.151 0.45,0.676 0.454,0.656 0.465,0.64 0.481,0.629 0.5,0.626 0.5,0.626 1.15,0.626 1.169,0.629 1.185,0.64 1.196,0.656 1.2,0.676
  Top Layer region: -1.2,0.676 -1.2,0.801 -1.196,0.82 -1.185,0.836 -1.169,0.847 -1.15,0.851 -1.15,0.851 -0.9,0.851 -0.881,0.854 -0.865,0.865 -0.854,0.881 -0.85,0.901 -0.85,0.901 -0.85,1.151 -0.846,1.17 -0.835,1.186 -0.819,1.197 -0.8,1.201 -0.8,1.201 -0.5,1.201 -0.481,1.197 -0.465,1.186 -0.454,1.17 -0.45,1.151 -0.45,1.151 -0.45,0.676 -0.454,0.656 -0.465,0.64 -0.481,0.629 -0.5,0.626 -0.5,0.626 -1.15,0.626 -1.169,0.629 -1.185,0.64 -1.196,0.656 -1.2,0.676
  body extent -1,-1 1,1, height 1
RRW0024-MFG [mm]
  rrect50% 0.47x0.2 smd paste+0 mask+0: 1(-1.465,1.2) 2(-1.465,0.8) 3(-1.465,0.4) 4(-1.465,0) 5(-1.465,-0.4) 6(-1.465,-0.8) 7(-1.465,-1.2) 13(1.465,-1.2) 14(1.465,-0.8) 15(1.465,-0.4) 16(1.465,0) 17(1.465,0.4) 18(1.465,0.8) 19(1.465,1.2)
  rrect50% 0.2x0.47 smd paste+0 mask+0: 8(-0.67,-1.465) 9(-0.27,-1.465) 10(0.13,-1.465) 11(0.53,-1.465) 12(0.93,-1.465) 20(0.93,1.465) 21(0.53,1.465) 22(0.13,1.465) 23(-0.27,1.465) 24(-0.67,1.465)
  rrect5% 1.9x1.9 smd paste-1000 mask+0: 25(0,0)
  silkscreen extent -2.78,-2.07 2.07,2.07, body extent -1.8,-1.8 1.8,1.8, height 0.25
Samtec_SSQ-110-03-x-D [mm] "Receptacle, 2.54mm, 10x2, TH"
  rect 1.55x1.55 hole 1.02: 1(-11.43,1.27)
  round 1.55 hole 1.02: 2(-11.43,-1.27) 3(-8.89,1.27) 4(-8.89,-1.27) 5(-6.35,1.27) 6(-6.35,-1.27) 7(-3.81,1.27) 8(-3.81,-1.27) 9(-1.27,1.27) 10(-1.27,-1.27) 11(1.27,1.27) 12(1.27,-1.27) 13(3.81,1.27) 14(3.81,-1.27) 15(6.35,1.27) 16(6.35,-1.27) 17(8.89,1.27) 18(8.89,-1.27) 19(11.43,1.27) 20(11.43,-1.27)
  silkscreen extent -12.95,-2.48 12.95,3, body extent -12.95,-2.48 12.95,2.48, height 8.51
SDR0805 [mm] "Bourns recommended land pattern"
  oval 2.7x8 smd: 1(-2.65,0) 2(2.65,0)
  rect 1.5x1.5 smd: 1(-2.05,-3.25) 1(-2.05,3.25) 2(2.05,-3.25) 2(2.05,3.25)
  body extent -3.88,-3.9 3.89,3.89, height 5.3
SNT-100-BK-G [mil] "Samtec STEP model"
  round 1 on Mech3: 0(0,0)
  body extent -100,-50 100,50, height 344
SOD-323 [mm] "NXP recommended land pattern"
  rect 0.6x0.6 smd paste-0.05: 1(-1.1,0) 2(1.1,0)
  silkscreen extent -2.06,-0.86 1.53,0.86, body extent -1.3,-0.67 1.3,0.68, height 1.1
Testpoint_Keystone_Miniature [mil] "Miniature SMT test point"
  rect 135x70 smd: 1(0,0)
  silkscreen extent -78,-46 78,45, body extent -52,-20 52,20, height 61
TI_Stacked_Overlay_Small [mm]
  silkscreen extent -10.63,-2.49 10.63,2.49
TNPW0603 [mm] "Vishay"
  rect 0.5x0.9 smd: 1(-0.75,0) 2(0.75,0)
  silkscreen extent -0.2,-0.6 0.2,0.6, body extent -0.85,-0.47 0.85,0.47, height 0.55
TSW-103-07-G-D [mm] "Samtec 100mil, 2x3, 230 mil above insulator"
  rect 1.65x1.65 hole 1.016: 1(-2.54,-1.27)
  round 1.65 hole 1.016: 2(-2.54,1.27) 3(0,-1.27) 4(0,1.27) 5(2.54,-1.27) 6(2.54,1.27)
  silkscreen extent -4.83,-2.54 3.81,2.54, body extent -3.81,-2.54 3.81,2.54, height 8.38
WEEE_Minimum [mm] "WEEElie bin"

## Part data
C1: library part CMP-0006343-2, "CAP, CERM, 0.1 uF, 10 V, +/- 10%, X7R, 0402", Cap_Case=0402, Manufacturer="Samsung Electro-Mechanics", TempCo=X7R, Tolerance_%=10%, Value1=Unknown, Value2=10V, ValueDisplayed=0.1uF, AEC Category=Q200, AEC Grade=N/A, AEC Qualified=N, Cap_F=100nF, ComponentLink1Description="Datasheet link", ComponentLink1URL=http://www.samsungsem.com/kr/front/downloadcms.do?path=/kr/support/product-search/mlcc/__icsFiles/afieldfile/2014/11/05&fileName=S_CL05B104KP5NNNC.pdf, CompType=Capacitor, LatestRevisionDate=2017-03-09, MountType=SMT, PackageReference=0402, PartNumber=CL05B104KP5NNNC, Polarized=N, Published=2008-06-19, Publisher="Texas Instruments", RoHS=Y, SizeArea_mm2=0.5, SizeAreaWB_mm2=3, SizeX_mm=1, SizeY_mm=0.5, SizeZ_mm=0.6, TaMax_C=125°C, TaMin_C=-55°C, Technology=Ceramic, U/M=EA, VDC_V=10V
C2: library part CMP-0007347-5, "CAP, CERM, 4.7 uF, 25 V, +/- 10%, X5R, 0603", Cap_Case=0603, Manufacturer=MuRata, Supplier Part Number 1=490-7203-1-ND, TempCo=X5R, Tolerance_%=10%, Value1=Unknown, Value2=25V, ValueDisplayed=4.7uF, AEC Category=Q200, AEC Grade=N/A, AEC Qualified=N, Cap_F=4.7µF, ComponentLink1Description="Datasheet link", ComponentLink1URL=http://search.murata.co.jp/Ceramy/image/img/A01X/G101/ENG/GRM188R61E475KE11-01.pdf, CompType=Capacitor, LatestRevisionDate=2017-03-09, MountType=SMT, PackageReference=0603, PartNumber=GRM188R61E475KE11D, Polarized=N, Published=2008-06-19, Publisher="Texas Instruments", RoHS=Y, SizeArea_mm2=1.28, SizeAreaWB_mm2=4.68, SizeX_mm=1.6, SizeY_mm=0.8, SizeZ_mm=1, Supplier 1=Digi-Key, Supplier 2=Newark, Supplier 3=Mouser, Supplier Part Number 2=68X2788, Supplier Part Number 3=81-GRM188R61E475KE1D, TaMax_C=85°C, TaMin_C=-55°C, Technology=Ceramic, U/M=EA, VDC_V=25V
C3: library part CMP-0009122-1, "CAP, CERM, 2.2 uF, 50 V, +/- 10%, X7R, 1210", Cap_Case=1210_280, Manufacturer=TDK, Supplier Part Number 1=445-1431-1-ND, TempCo=X7R, Tolerance_%=10%, Value1="0.00536 ohm", Value2=50V, ValueDisplayed=2.2uF, AEC Category=Q200, AEC Grade=N/A, AEC Qualified=N, Cap_F=2.2µF, ComponentLink1Description="Datasheet link", ComponentLink1URL=https://product.tdk.com/en/search/capacitor/ceramic/mlcc/info?part_no=C3225X7R1H225K250AB, CompType=Capacitor, ESR_ohm=5.36m, IRMS_A=3.17778A, LatestRevisionDate=2017-03-09, MountType=SMT, PackageReference=1210, PartNumber=C3225X7R1H225K250AB, Polarized=N, Published=2008-06-19, Publisher="Texas Instruments", RoHS=Y, SizeArea_mm2=8, SizeAreaWB_mm2=14.7, SizeX_mm=3.2, SizeY_mm=2.5, SizeZ_mm=2.8, Supplier 1=Digi-Key, Supplier 2=Newark, Supplier 3=Mouser, Supplier Part Number 2=87R4491, Supplier Part Number 3=810-C3225X7R1H225K11, TaMax_C=125°C, TaMin_C=-55°C, Technology=Ceramic, U/M=EA, VDC_V=50V
C4 C9 C17: library part CMP-0007725-2, "CAP, CERM, 0.1 uF, 50 V, +/- 10%, X7R, AEC-Q200 Grade 0, 0805", Cap_Case=0805, Manufacturer=Kemet, Supplier Part Number 1=399-6928-1-ND, TempCo=X7R, Tolerance_%=10%, Value1=Unknown, Value2=50V, ValueDisplayed=0.1uF, AEC Category=Q200, AEC Grade=0, AEC Qualified=Y, Cap_F=100nF, ComponentLink1Description="Datasheet link", ComponentLink1URL=http://www.kemet.com/Lists/ProductCatalog/Attachments/53/KEM_C1002_X7R_SMD.pdf, CompType=Capacitor, LatestRevisionDate=2017-03-09, MountType=SMT, PackageReference=0805, PartNumber=C0805C104K5RACAUTO, Polarized=N, Published=2008-06-19, Publisher="Texas Instruments", RoHS=Y, SizeArea_mm2=2.5, SizeAreaWB_mm2=6.75, SizeX_mm=2, SizeY_mm=1.25, SizeZ_mm=1.45, Supplier 1=Digi-Key, Supplier 2=Newark, Supplier 3=Mouser, Supplier Part Number 2=86T2620, Supplier Part Number 3=80-C0805C104K5RAUTO, TaMax_C=125°C, TaMin_C=-55°C, Technology=Ceramic, U/M=EA, VDC_V=50V
C5: library part CMP-0007120-4, "CAP, CERM, 1 uF, 16 V, +/- 10%, X7R, 0603", Cap_Case=0603, Manufacturer="Taiyo Yuden", Supplier Part Number 1=1683647, TempCo=X7R, Tolerance_%=10%, Value1=Unknown, Value2=16V, ValueDisplayed=1uF, AEC Category=Q200, AEC Qualified=?, Cap_F=1µF, ComponentLink1Description="Datasheet link", ComponentLink1URL=http://www.yuden.co.jp/ut/product/pdf/djmk_e.pdf, CompType=Capacitor, LatestRevisionDate=2017-03-09, MountType=SMT, PackageReference=0603, PartNumber=EMK107B7105KA-T, Polarized=N, Published=2008-06-19, Publisher="Texas Instruments", RoHS=Y, SizeArea_mm2=1.28, SizeAreaWB_mm2=4.68, SizeX_mm=1.6, SizeY_mm=0.8, SizeZ_mm=1, Supplier 1=Farnell, TaMax_C=85°C, TaMin_C=-55°C, Technology=Ceramic, U/M=EA, VDC_V=16V
C6: library part CMP-0007110-4, "CAP, CERM, 0.1 uF, 16 V, +/- 10%, X7R, 0603", Cap_Case=0603, Manufacturer="Samsung Electro-Mechanics", TempCo=X7R, Tolerance_%=10%, Value1=Unknown, Value2=16V, ValueDisplayed=0.1uF, AEC Category=Q200, AEC Qualified=?, Cap_F=100nF, ComponentLink1Description="Datasheet link", ComponentLink1URL=http://www.samsungsem.com/kr/front/downloadcms.do?path=/kr/support/product-search/mlcc/__icsFiles/afieldfile/2014/11/05&fileName=S_CL10B104KO8NNNC.pdf, CompType=Capacitor, LatestRevisionDate=2017-03-09, MountType=SMT, PackageReference=0603, PartNumber=CL10B104KO8NNNC, Polarized=N, Published=2008-06-19, Publisher="Texas Instruments", RoHS=Y, SizeArea_mm2=1.28, SizeAreaWB_mm2=4.68, SizeX_mm=1.6, SizeY_mm=0.8, SizeZ_mm=1, TaMax_C=125°C, TaMin_C=-55°C, Technology=Ceramic, U/M=EA, VDC_V=16V
C7: library part CMP-0008959-2, "CAP, CERM, 22 uF, 10 V, +/- 10%, X7R, 1206", Cap_Case=1206, Manufacturer=MuRata, Supplier Part Number 1=490-5309-1-ND, TempCo=X7R, Tolerance_%=10%, Value1=Unknown, Value2=10V, ValueDisplayed=22uF, AEC Category=Q200, AEC Qualified=?, Cap_F=22µF, ComponentLink1Description="Datasheet link", ComponentLink1URL=http://search.murata.co.jp/Ceramy/PnsearchViewAction.do?HnOFG=ON&HnNFG=ON&SEL_CNT=50&sLang=en&sKey=GRM31CR71A226KE15L&x=9&y=9&search=startwith, CompType=Capacitor, LatestRevisionDate=2017-03-09, MountType=SMT, PackageReference=1206, PartNumber=GRM31CR71A226KE15L, Polarized=N, Published=2008-06-19, Publisher="Texas Instruments", RoHS=Y, SizeArea_mm2=5.12, SizeAreaWB_mm2=10.92, SizeX_mm=3.2, SizeY_mm=1.6, SizeZ_mm=1.8, Supplier 1=Digi-Key, Supplier 2=Mouser, Supplier 3=Farnell, Supplier Part Number 2=81-GRM31CR71A226K15L, Supplier Part Number 3=1797016, TaMax_C=125°C, TaMin_C=-55°C, Technology=Ceramic, U/M=EA, VDC_V=10V
C8 C19: library part CMP-0008262-2, "CAP, CERM, 10 uF, 25 V, +/- 10%, X7S, 0805", Cap_Case=0805, Manufacturer=MuRata, Supplier Part Number 1=490-10496-1-ND, TempCo=X7S, Tolerance_%=10%, Value1=Unknown, Value2=25V, ValueDisplayed=10uF, AEC Category=Q200, AEC Grade=N/A, AEC Qualified=N, Cap_F=10µF, ComponentLink1Description="Datasheet link", ComponentLink1URL=http://psearch.en.murata.com/capacitor/product/GRM21BC71E106KE11%23.pdf, CompType=Capacitor, LatestRevisionDate=2017-03-09, MountType=SMT, PackageReference=0805, PartNumber=GRM21BC71E106KE11L, Polarized=N, Published=2008-06-19, Publisher="Texas Instruments", RoHS=Y, SizeArea_mm2=2.5, SizeAreaWB_mm2=6.75, SizeX_mm=2, SizeY_mm=1.25, SizeZ_mm=1.45, Supplier 1=Digi-Key, Supplier 2=Mouser, Supplier Part Number 2=81-GRM21BC71E106KE1L, TaMax_C=125°C, TaMin_C=-55°C, Technology=Ceramic, U/M=EA, VDC_V=25V
C10 C11 C12: library part CMP-0007071-4, "CAP, CERM, 22 pF, 50 V, +/- 5%, C0G/NP0, AEC-Q200 Grade 1, 0603", Cap_Case=0603, Manufacturer=TDK, Supplier Part Number 1=445-5632-1-ND, TempCo=C0G/NP0, Tolerance_%=5%, Value1=Unknown, Value2=50V, ValueDisplayed=22pF, AEC Category=Q200, AEC Grade=1, AEC Qualified=Y, Cap_F=22pF, ComponentLink1Description="Datasheet link", ComponentLink1URL=http://product.tdk.com/en/catalog/datasheets/mlcc_automotive_general_en.pdf, CompType=Capacitor, LatestRevisionDate=2017-03-09, MountType=SMT, PackageReference=0603, PartNumber=CGA3E2C0G1H220J080AA, Polarized=N, Published=2008-06-19, Publisher="Texas Instruments", RoHS=Y, SizeArea_mm2=1.28, SizeAreaWB_mm2=4.68, SizeX_mm=1.6, SizeY_mm=0.8, SizeZ_mm=1, Supplier 1=Digi-Key, Supplier 2=Newark, Supplier 3=Mouser, Supplier Part Number 2=12T1569, Supplier Part Number 3=810-CGA3E2C0G1H220J, TaMax_C=125°C, TaMin_C=-55°C, Technology=Ceramic, U/M=EA, VDC_V=50V
C13 C15: library part CMP-0086271-1, "CAP, CERM, 0.1 µF, 6.3 V,+/- 10%, X7R, 0603", Cap_Case=0603, Manufacturer=Kemet, TempCo=X7R, Tolerance_%=10%, Value2=6.3V, ValueDisplayed=0.1µF, AEC Category=Q200, AEC Grade=N/A, AEC Qualified=N, Cap_F=100nF, ComponentLink1Description="Datasheet link", ComponentLink1URL=https://api.kemet.com/component-edge/download/datasheet/C0603C104K9RACTU.pdf, CompType=Capacitor, MountType=SMT, PackageReference=0603, PartNumber=C0603C104K9RAC7867, Polarized=N, RoHS=Y, SizeArea_mm2=1.28, SizeAreaWB_mm2=4.68, SizeX_mm=1.6, SizeY_mm=0.8, SizeZ_mm=1, TaMax_C=125°C, TaMin_C=-55°C, Technology=Ceramic, U/M=EA, VDC_V=6.3V
C14: library part CMP-0007111-4, "CAP, CERM, 1 uF, 6.3 V, +/- 10%, X7R, 0603", Cap_Case=0603, Manufacturer="Samsung Electro-Mechanics", TempCo=X7R, Tolerance_%=10%, Value1=Unknown, Value2=6.3V, ValueDisplayed=1uF, AEC Category=Q200, AEC Qualified=?, Cap_F=1µF, ComponentLink1Description="Datasheet link", ComponentLink1URL=http://www.samsungsem.com/kr/front/downloadcms.do?path=/kr/support/product-search/mlcc/__icsFiles/afieldfile/2014/11/05&fileName=S_CL10B105KQ8NNNC.pdf, CompType=Capacitor, LatestRevisionDate=2017-03-09, MountType=SMT, PackageReference=0603, PartNumber=CL10B105KQ8NNNC, Polarized=N, Published=2008-06-19, Publisher="Texas Instruments", RoHS=Y, SizeArea_mm2=1.28, SizeAreaWB_mm2=4.68, SizeX_mm=1.6, SizeY_mm=0.8, SizeZ_mm=1, TaMax_C=125°C, TaMin_C=-55°C, Technology=Ceramic, U/M=EA, VDC_V=6.3V
C16: library part CMP-0090609-1, "47µF ±20% 25V Ceramic Capacitor X5R 1206 (3216 Metric)", Digikey Part Number=490-16268-1-ND, Manufacturer=Murata, Mouser Part Number=81-GRM31CR61E476ME4L, Operating Temperature Range="-55°C to +85°C", TempCo=15%, Temperature Characteristic=X5R, Tolerance_%=20%, ValueDisplayed=47uF, AEC Qualified=No, Cap_F=47µF, ComponentLink1Description=Datasheet, ComponentLink1URL=https://www.murata.com/~/media/webrenewal/support/library/catalog/products/capacitor/mlcc/c02e.ashx, datasheet=https://www.murata.com/~/media/webrenewal/support/library/catalog/products/capacitor/mlcc/c02e.ashx, Datasheet Path=datasheets/Cap-GRM31CR61E476ME44L.pdf, Digikey Description="CAP CER 47UF 25V X5R 1206", helpURL=https://upverter.com/upn/revision/49488aee9021d1b4/, Lead Free=Yes, PackageReference=1206, Part Number=GRM31CR61E476ME44L, PartNumber=GRM31CR61E476ME44L, RoHS=TRUE, SizeZ_mm=1.9mm, Supplier 1=Digikey, Supplier 2=Mouser, Supplier Part Number 1=490-16268-1-ND, Supplier Part Number 2=81-GRM31CR61E476ME4L, VDC_V=25V
C18: library part CMP-0007696-2, "CAP, CERM, 1 uF, 50 V, +/- 10%, X7R, 0805", Cap_Case=0805, Manufacturer="Wurth Elektronik", Supplier Part Number 1=710-885012207103, TempCo=X7R, Tolerance_%=10%, Value1=Unknown, Value2=50V, ValueDisplayed=1uF, AEC Category=Q200, AEC Grade=N/A, AEC Qualified=N, Cap_F=1µF, ComponentLink1Description="Datasheet link", ComponentLink1URL=http://katalog.we-online.de/pbs/datasheet/885012207103.pdf, CompType=Capacitor, LatestRevisionDate=2017-03-09, MountType=SMT, PackageReference=0805, PartNumber=885012207103, Polarized=N, Published=2008-06-19, Publisher="Texas Instruments", RoHS=Y, SizeArea_mm2=2.5, SizeAreaWB_mm2=6.75, SizeX_mm=2, SizeY_mm=1.25, SizeZ_mm=1.45, Supplier 1=Mouser, TaMax_C=125°C, TaMin_C=-55°C, Technology=Ceramic, U/M=EA, VDC_V=50V
C20 C21 C22 C23: library part CMP-0083854-1, "CAP, CERM, 0.1 µF, 50 V,+/- 5%, X7R, 0603", Cap_Case=0603, Manufacturer=AVX, TempCo=X7R, Tolerance_%=5%, Value2=50V, ValueDisplayed=0.1µF, AEC Category=Q200, AEC Grade=N/A, AEC Qualified=N, Cap_F=100nF, ComponentLink1Description="Datasheet link", ComponentLink1URL=http://datasheets.avx.com/X7RDielectric.pdf, CompType=Capacitor, Green_EU RoHS=Passed, Green_EU RoHS-2=Passed, Green_Lifecycle=Active, Green_REACh=Passed, MountType=SMT, PackageReference=0603, PartNumber=06035C104JAT2A, Polarized=N, RoHS=Y, SizeArea_mm2=1.28, SizeAreaWB_mm2=4.68, SizeX_mm=1.6, SizeY_mm=0.8, SizeZ_mm=1, TaMax_C=125°C, TaMin_C=-55°C, Technology=Ceramic, U/M=EA, VDC_V=50V
C24 C25 C26: library part CMP-0006826-4, "CAP, CERM, 1000 pF, 16 V, +/- 10%, X7R, 0603", Cap_Case=0603, Manufacturer="Wurth Elektronik", Supplier Part Number 1=710-885012206034, TempCo=X7R, Tolerance_%=10%, Value1=Unknown, Value2=16V, ValueDisplayed=1000pF, AEC Category=Q200, AEC Grade=N/A, AEC Qualified=N, Cap_F=1nF, ComponentLink1Description="Datasheet link", ComponentLink1URL=http://katalog.we-online.de/pbs/datasheet/885012206034.pdf, CompType=Capacitor, LatestRevisionDate=2017-03-09, MountType=SMT, PackageReference=0603, PartNumber=885012206034, Polarized=N, Published=2008-06-19, Publisher="Texas Instruments", RoHS=Y, SizeArea_mm2=1.28, SizeAreaWB_mm2=4.68, SizeX_mm=1.6, SizeY_mm=0.8, SizeZ_mm=1, Supplier 1=Mouser, TaMax_C=125°C, TaMin_C=-55°C, Technology=Ceramic, U/M=EA, VDC_V=16V
C27: library part CMP-0006811-4, "CAP, CERM, 10 pF, 10 V, +/- 10%, X7R, 0603", Cap_Case=0603, Manufacturer=AVX, Supplier Part Number 1=0603ZC100KAT2A-ND, TempCo=X7R, Tolerance_%=10%, Value1=Unknown, Value2=10V, ValueDisplayed=10pF, AEC Category=Q200, AEC Grade=N/A, AEC Qualified=N, Cap_F=10pF, ComponentLink1Description="Datasheet link", ComponentLink1URL=http://datasheets.avx.com/X7RDielectric.pdf, CompType=Capacitor, LatestRevisionDate=2017-03-09, MountType=SMT, PackageReference=0603, PartNumber=0603ZC100KAT2A, Polarized=N, Published=2008-06-19, Publisher="Texas Instruments", RoHS=Y, SizeArea_mm2=1.28, SizeAreaWB_mm2=4.68, SizeX_mm=1.6, SizeY_mm=0.8, SizeZ_mm=1, Supplier 1=Digi-Key, Supplier 2=Newark, Supplier 3=Mouser, Supplier Part Number 2=66M2930, Supplier Part Number 3=581-0603ZC100KAT2A, TaMax_C=125°C, TaMin_C=-55°C, Technology=Ceramic, U/M=EA, VDC_V=10V
D1: library part CMP-0085730-1, "Diode, Zener, 3.3 V, 300 mW, AEC-Q101, SOD-323", Manufacturer="ON Semiconductor", Power_W=300mW, Value1=0.3W, AEC Category=Q101, AEC Qualified=Y, ComponentLink1Description="Datasheet link", ComponentLink1URL=https://www.onsemi.com/pub/Collateral/MM3Z2V4ST1-D.PDF, CompType=Zener, MountType=SMT, PackageReference=SOD-323, PartNumber=SZMM3Z3V3ST1G, RJA_CperW=416, RoHS=Y, SizeArea_mm2=3.645, SizeAreaWB_mm2=8.695, SizeX_mm=2.7, SizeY_mm=1.35, SizeZ_mm=1, Vz_V=3.3V
D2 D4: library part CMP-0002888-2, "LED, Green, SMD", Color=Green, Manufacturer=Lite-On, Value1=W, Value2=2V, ComponentLink1Description="Datasheet link", ComponentLink1URL=http://optoelectronics.liteon.com/upload/download/DS22-2000-073/S_110_LTST-C170KGKT.pdf, CompType=LED, Io_A=20mA, MountType=SMT, PackageReference=LED_0805, PartNumber=LTST-C170KGKT, RoHS=Y, Type=AlInGaP, Vf_V=2V
D3: library part CMP-0002829-3, "LED, Red, SMD", Color=red, Manufacturer=Lite-On, Value1=W, Value2=2V, ComponentLink1Description="Datasheet link", ComponentLink1URL=http://optoelectronics.liteon.com/upload/download/DS-22-99-0150/P_100_LTST-C170KRKT.pdf, CompType=LED, Io_A=20mA, MountType=SMT, PackageReference="Red 0805 LED", PartNumber=LTST-C170KRKT, RoHS=Y, SizeArea_mm2=2.5, SizeAreaWB_mm2=6.75, SizeX_mm=2, SizeY_mm=1.25, SizeZ_mm=1.2, Type=AlInGaP, Vf_V=2V
D5: library part CMP-0002890-1, "LED, Orange, SMD", Color=orange, Manufacturer=Lite-On, Supplier Part Number 1=160-1413-1-ND, Value1=W, Value2=2V, ComponentLink1Description="Datasheet link", ComponentLink1URL=http://optoelectronics.liteon.com/upload/download/DS-22-99-0185/S_110_LTST-C170KFKT.pdf, CompType=LED, Io_A=20mA, LatestRevisionDate=2017-03-09, MountType=SMT, PackageReference=LED_0805, PartNumber=LTST-C170KFKT, Published=2008-07-11, Publisher="Texas Instruments", RoHS=Y, Supplier 1=Digi-Key, Type=AlInGaP, U/M=EA, Vf_V=2V
FID1 FID2 FID3: library part CMP-0077181-1, "Fiducial mark.  There is nothing to buy or mount.", Manufacturer=N/A, ClassName=FiducialMark, CompType=Fiducial, MountType=N/A, PackageReference=N/A, PartNumber=N/A
GND1 GND2 GND3: library part CMP-0075110-1, "1mm Uninsulated Shorting Plug, 10.16mm spacing, TH", Manufacturer=Harwin, PartNumber=D3082-05, Supplier Part Number 1=952-1873-ND, CNHeader=False, ComponentLink1Description="Datasheet URL", ComponentLink1URL=http://cdn.harwin.com/pdfs/D3080-D3083.pdf, CompType="Jumper Wire", CT=False, Green_EU RoHS="Passed with Exemption", Green_EU RoHS-2=Passed, Green_Lifecycle=Active, Green_REACh=Passed, LatestRevisionDate=2017-07-12, MountType=TH, PackageReference="Shorting Plug, 10.16mm spacing, TH", Publisher="Texas Instruments", RoHS=Y, Supplier 1=Digi-Key, Supplier 2=Newark, Supplier 3=Mouser, Supplier Part Number 2=01E9240, Supplier Part Number 3=855-D3082-05
J1 J2: library part CMP-0075613-1, "Receptacle, 2.54mm, 10x2, Gold, TH", Color=Black, Current_A=6.3A, Manufacturer=Samtec, Voltage_V=550V, Cert_CSA=Y, Cert_CULUS=N, Cert_UL=Y, Cert_VDE=N, CNHeader=False, ComponentLink1Description="Datasheet URL", ComponentLink1URL=https://www.samtec.com/ftppub/cpdf/SSQ-1XX-XX-XXX-X-XX-XXX-XX-X-MKT.pdf, CompType="Socket Strip", ContactFinish=Gold, CT=True, Gender=Female, LatestRevisionDate=2017-07-12, MountType=TH, Orientation=Vertical, PackageReference="Receptacle, 2.54mm, 10x2, TH", PartNumber=SSQ-110-03-G-D, PinCount=20, Pitch_mm=2.54, Publisher="Texas Instruments", RoHS=Y, Row_Count=2, RowSpacing_mm=2.54
J3: library part CMP-0074910-1, "Terminal Block, 5.08 mm, 2x1, Brass, TH", Color=Blue, Current_A=15A, Manufacturer="On-Shore Technology", PartNumber=ED120/2DS, Supplier Part Number 1=ED1609-ND, Voltage_V=300V, Cert_CULUS=Y, Cert_VDE=Y, CNHeader=False, ComponentLink1Description="Datasheet URL", ComponentLink1URL=http://www.on-shore.com/sites/default/files/manuals/ed120ds.pdf, CompType="Terminal Block", ContactFinish=Brass, CT=True, Gender=Female, Green_EU RoHS=Incomplete, Green_EU RoHS-2=Incomplete, Green_Lifecycle="Not Set", Green_REACh=Incomplete, LatestRevisionDate=2017-07-12, MountType=TH, Orientation=Vertical, PackageReference="2x1 5.08 mm Terminal Block", PinCount=2, Pitch_mm=5.08, Publisher="Texas Instruments", RoHS=Y, Row_Count=1, Shrouded=N, Supplier 1=Digi-Key
J4: library part CMP-0055532-1, "Terminal Block, 5mm, 5x1, R/A, TH", Color=Green, Current_A=16A, Manufacturer="Phoenix Contact", PartNumber=1792892, Supplier Part Number 1=277-2521-ND, Voltage_V=400V, Cert_CULUS=Y, Cert_UL=Y, Cert_VDE=Y, CNHeader=FALSE, ComponentLink1Description="Datasheet URL", ComponentLink1URL=https://www.phoenixcontact.com/online/portal/pi?uri=pxc-oc-itemdetail:pid=1792892&library=pien&pcck=P-11-01-05&tab=1, CompType="Terminal Block", CT=TRUE, Gender=Female, LatestRevisionDate=26/05/2017, MountType=TH, Orientation=R/A, PackageReference="Terminal Block, 5mm, 5x1, R/A, TH", PinCount=5, Pitch_mm=5, Publisher="Texas Instruments", RoHS=Y, Row_Count=1, Supplier 1=Digi-Key, Supplier 2=Newark, Supplier 3=Mouser, Supplier Part Number 2=78T0423, Supplier Part Number 3=651-1792892
J5 J6 J7 J8: library part CMP-0065026-1, "Header, 2.54mm, 3x1, Tin, TH", Color=Black, Current_A=3A, Manufacturer=FCI, PartNumber=68001-403HLF, Supplier Part Number 1=609-3471-ND, Voltage_V=1.5kV, Cert_CSA=Y, Cert_UL=Y, ClassName=Header, CNHeader=True, ComponentLink1Description="Datasheet URL", ComponentLink1URL=http://portal.fciconnect.com/Comergent//fci/drawing/68000.pdf, CompType=Header, ContactFinish=Tin, CT=False, Gender=Male, LatestRevisionDate=2017-06-05, MountType=TH, Orientation=Vertical, PackageReference="Header, 2.54mm, 3x1, TH", PinCount=3, Pitch_mm=2.54, Publisher="Texas Instruments", RoHS=Y, Row_Count=1, Shrouded=N, Supplier 1=Digi-Key, Supplier 2=Newark, Supplier 3=Mouser, Supplier Part Number 2=44P3034, Supplier Part Number 3=649-68001-403HLF
J9: library part CMP-0074911-1, "Terminal Block, 5.08 mm, 3x1, Brass, TH", Color=Blue, Current_A=15A, Manufacturer="On-Shore Technology", PartNumber=ED120/3DS, Supplier Part Number 1=ED1610-ND, Voltage_V=300V, Cert_CULUS=Y, Cert_VDE=Y, CNHeader=False, ComponentLink1Description="Datasheet URL", ComponentLink1URL=http://www.on-shore.com/sites/default/files/manuals/ed120ds.pdf, CompType="Terminal Block", ContactFinish=Brass, CT=True, Gender=Female, Green_EU RoHS=Incomplete, Green_EU RoHS-2=Incomplete, Green_Lifecycle="Not Set", Green_REACh=Incomplete, LatestRevisionDate=2017-07-12, MountType=TH, Orientation=Vertical, PackageReference="3x1 5.08 mm Terminal Block", PinCount=3, Pitch_mm=5.08, Publisher="Texas Instruments", RoHS=Y, Row_Count=1, Shrouded=N, Supplier 1=Digi-Key
J10 J11 J12: library part CMP-0075406-2, "Header, 100mil, 3x2, Gold, TH", Color=Black, Current_A=6.3A, Manufacturer=Samtec, PartNumber=TSW-103-07-G-D, Supplier Part Number 1=SAM1028-03-ND, Voltage_V=550V, Cert_CSA=Y, Cert_CULUS=N, Cert_UL=Y, Cert_VDE=N, ClassName=Header, ComponentLink1Description="Datasheet URL", ComponentLink1URL=http://samtec.com/ftppub/pdf/TSW_TH.PDF, CompType=Header, ContactFinish=Gold, Gender=Male, Green_EU RoHS=Passed, Green_EU RoHS-2=Passed, Green_Lifecycle=Active, Green_REACh=Passed, MountType=TH, Orientation=Vertical, PackageReference="3x2 Header", PinCount=6, Pitch_mm=2.54, RoHS=Y, Row_Count=2, RowSpacing_mm=2.54, Shrouded=N, Supplier 1=Digi-Key
L1: library part CMP-0057502-2, "Inductor, Drum Core, Ferrite, 12 uH, 2 A, 0.08 ohm, SMD", Manufacturer=Bourns, Supplier Part Number 1=SDR0805-120MLCT-ND, Value1="0.08 ohm", Value2=2A, ValueDisplayed=12uH, AEC Category=Q200, AEC Qualified=?, ComponentLink1Description="Datasheet link", ComponentLink1URL=http://www.bourns.com/data/global/pdfs/SDR0805.pdf, CompType=Inductor, DCR_ohm=0.08, Green_EU RoHS=Passed, Green_EU RoHS-2=Incomplete, Green_Lifecycle=Active, Green_REACh=Passed, Imax_A=2A, Ind_H=12µH, Irms="2A @ 40C rise", Isat="3A @ 10% inductance drop", LatestRevisionDate=2017-06-02, Material=Ferrite, MountType=SMT, PackageReference=SDR0805, PartNumber=SDR0805-120ML, Published=2008-06-26, Publisher="Texas Instruments", RoHS=Y, SizeArea_mm2=60.84, SizeAreaWB_mm2=96.04, SizeX_mm=7.8, SizeY_mm=7.8, SizeZ_mm=5.3, Supplier 1=Digi-Key, Supplier 2=Mouser, Supplier Part Number 2=652-SDR0805-120ML, Technology="Drum Core"
LBL1: library part CMP-0003625-1, "Thermal Transfer Printable Labels, 0.650\" W x 0.200\" H - 10,000 per roll", Manufacturer=Brady, Supplier Part Number 1=97C5133, ClassName=Label, ComponentLink1Description="Web Page", ComponentLink1URL=http://www.bradyid.com/bradyid/pdpv/THT-14-423-10.html, CompType=Label, Key=THT-14-423-10, LatestRevisionDate=2017-03-09, MountType=N/A, Note="Size: 0.65\" x 0.20 \"", PackageReference="PCB Label 0.650 x 0.200 inch", PartNumber=THT-14-423-10, Publisher="Texas Instruments", RoHS=Y, Supplier 1=Newark, Supplier 2=Farnell, Supplier Part Number 2=2065596
Logo1: library part CMP-0074844-1, LatestRevisionDate=2017-07-06, Lib Reference="CE Mark", PartNumber="CE Mark", Published=2009-03-03, Publisher="Texas Instruments", SymbolCreator=a0412235
Logo2: library part CMP-0074838-1, "Texas Instrument Corporate Signature", ClassName=Logo, LatestRevisionDate=2017-07-06, Lib Reference=TI_Logo, PartNumber="Texas Instruments", Published=2009-03-03, Publisher="Texas Instruments", SymbolCreator=a0412235, SymbolVersion=2011-08-22
Logo3: library part CMP-0074847-1, "FCC_disclaimer", LatestRevisionDate=2017-07-06, Lib Reference=FCC_disclaimer, PartNumber="FCC disclaimer", Published=2009-03-03, Publisher="Texas Instruments"
Logo4: library part CMP-0074769-1, Lib Reference="WEEE logo", PartNumber="WEEE logo"
LOGO5: library part CMP-0074837-1, "IEC 61010-1 Hot Surface Warning", LatestRevisionDate=2017-07-06, Lib Reference=IEC_HotSurface, PartNumber="CAUTION HOT SURFACE", Published=2009-03-03, Publisher="Texas Instruments", SymbolCreator=a0412235, SymbolVersion=2011-08-22